# Altium PCB PCB1.PcbDoc (part 3 of 3)
Units mm, origin at the board's own origin, x right, y up, seen from the top; angles counter-clockwise.
Board outline 131 x 74 mm, 6 copper layers (Top Layer, Rele, Signals, +5V, GND, Bottom Layer), stack 1.732 mm thick; 176 components, 158 nets, 639 pads, 196 vias.
Unrouted connection lines stored in the file: 8.
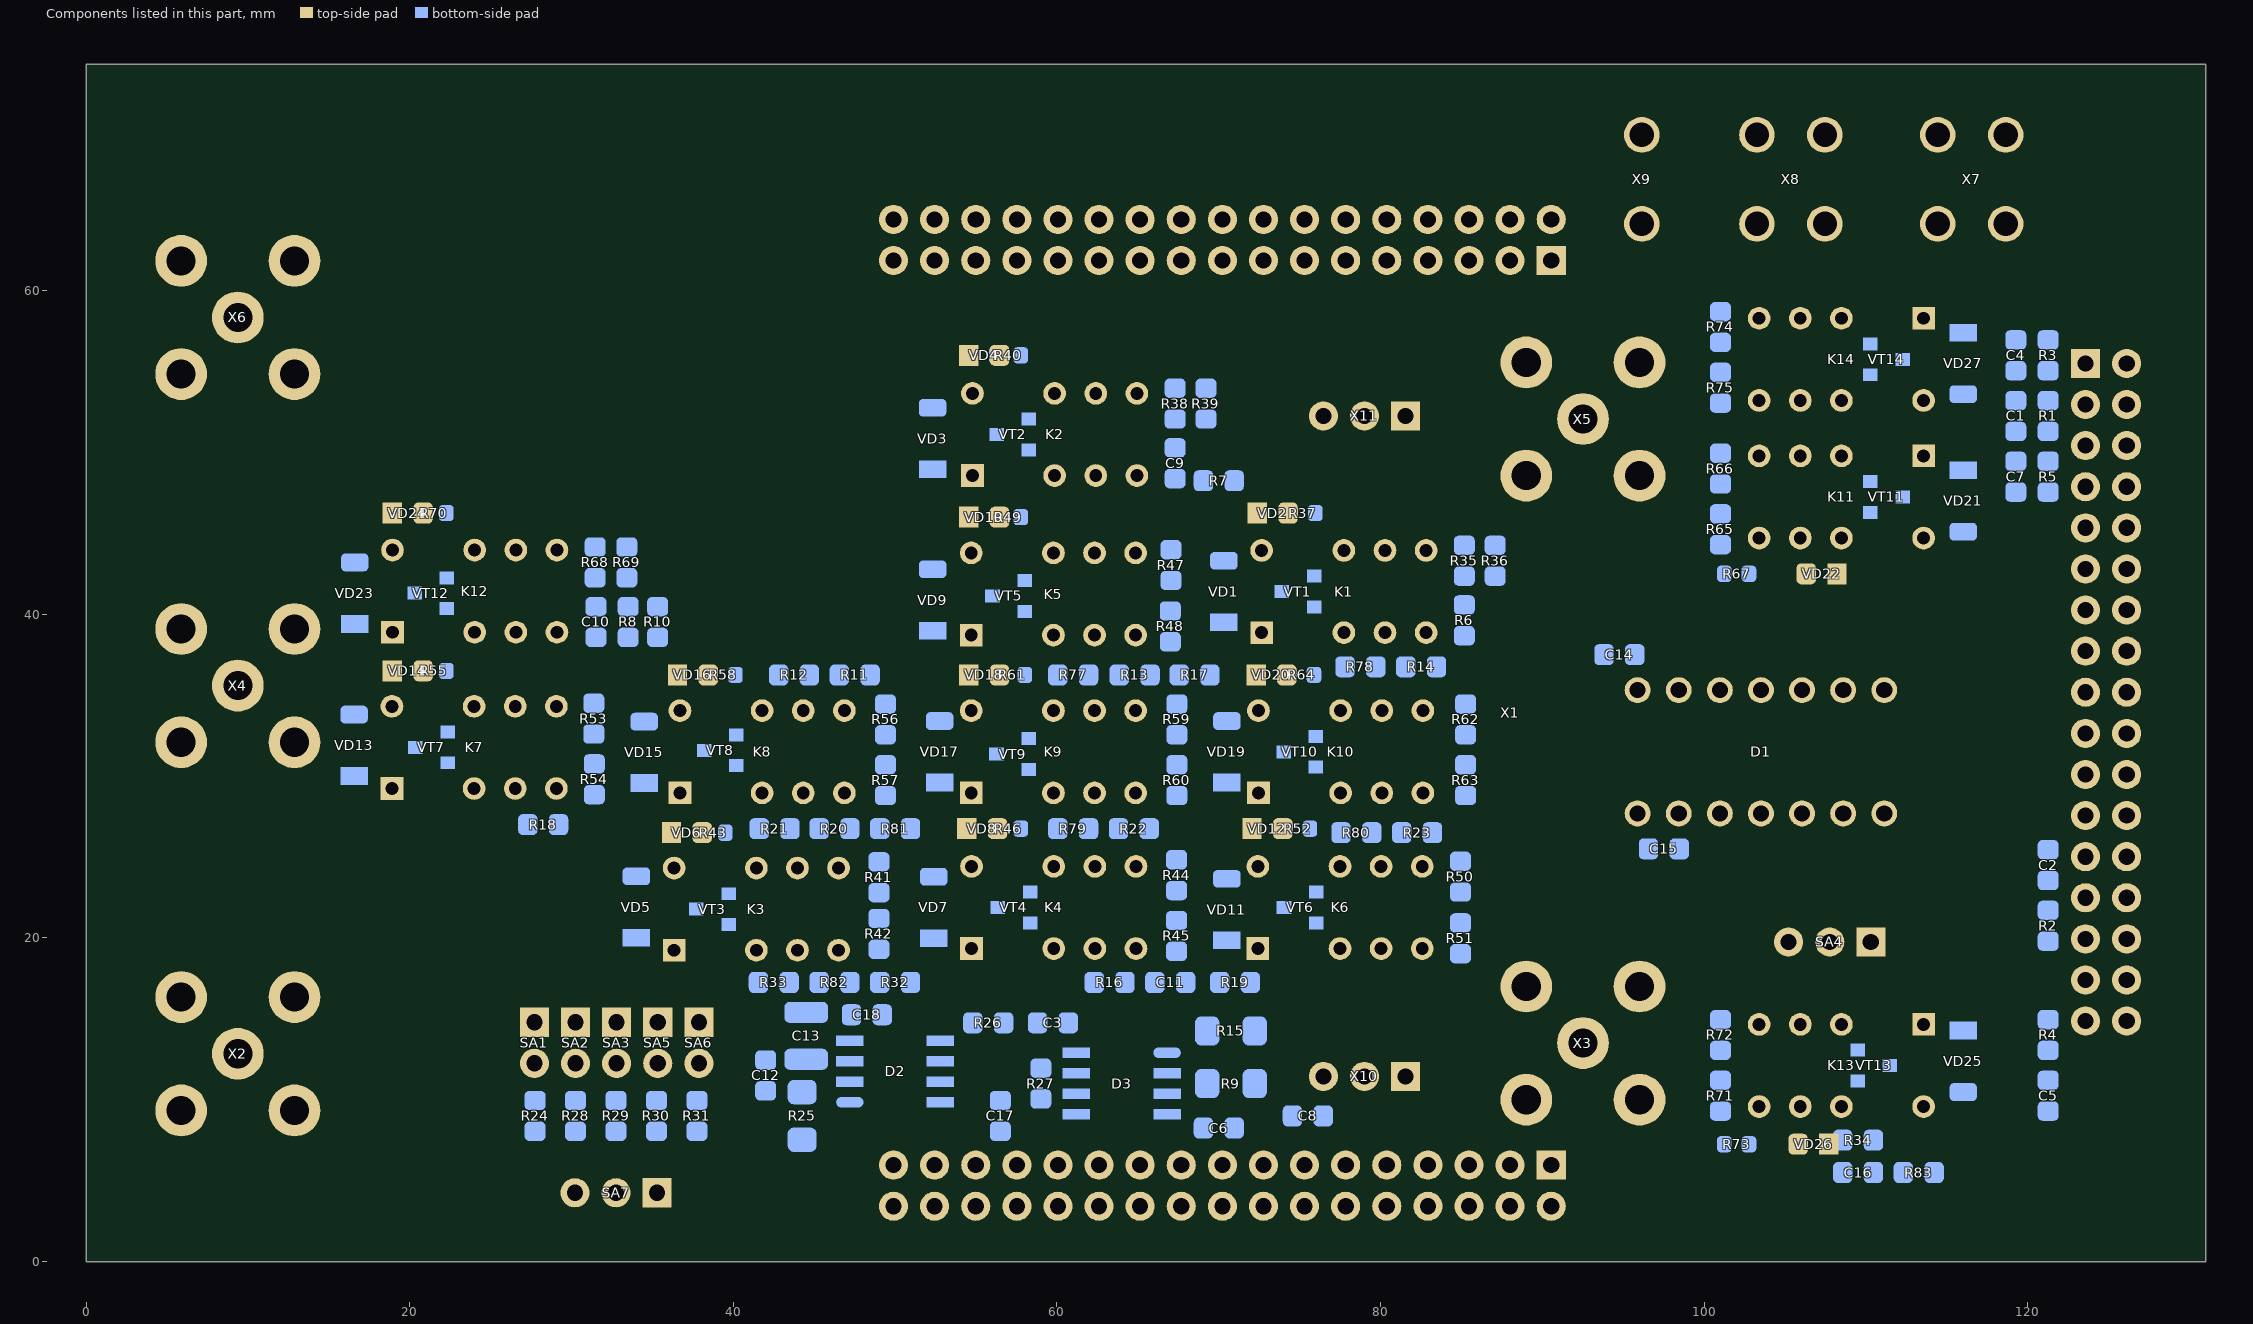
[diagram p7: the components of this part, seen from the top]

## Other copper (continued)
GND:
  pour cut-out: 122.058,25.095 122.058,24 122.5,24
  pour cut-out: 87,9 90.75,9 90.75,7
  pour cut-out: 91.277,9.65 91.277,5.959 90.539,5.959
  pour cut-out: 86.723,9.65 86.723,6 88,6
  pour cut-out: 20.74,35.592 19.75,35.592 19.75,36
  pour cut-out: 20.74,37.408 19.75,37.408 19.75,36.5
  pour cut-out: 17.639,40.187 17.639,34.312 18.903,34.312
  pour cut-out: 20.239,40.187 20.239,34.312 18.903,34.312
  pour cut-out: 122.413,22.323 122.413,20.471 123.001,20.471
  pour cut-out: 122.412,22.606 121.25,22.606 121.25,23.55
  pour cut-out: 121.25,24.458 123,24.458 123,24.25
  pour cut-out: 85.25,33.542 82.61,33.542 82.61,34.04
  pour cut-out: 85.25,35.358 82.61,35.358 82.61,34.04
  pour cut-out: 85.172,43.349 82.809,43.349 82.809,43.942
  pour cut-out: 85.172,45.165 82.809,45.165 82.809,43.942
  pour cut-out: 67.299,53.057 64.936,53.057 64.936,53.65
  pour cut-out: 67.299,54.873 64.936,54.873 64.936,53.65
  pour cut-out: 56.076,49.87 56.076,45.75 55.5,45.75
  pour cut-out: 53.476,49.87 53.476,43.79 54.7,43.79
  pour cut-out: 56.011,43.79 56.011,48.57 54.776,48.57
  pour cut-out: 56.49,35.342 55.5,35.342 55.5,35.75
  pour cut-out: 58,35.342 60.05,35.342 60.05,36.25
  pour cut-out: 56.49,37.158 55.5,37.158 55.5,36.75
  pour cut-out: 58,37.158 60.05,37.158 60.05,36.25
  pour cut-out: 53.389,34.04 53.389,38.71 54.7,38.71
  pour cut-out: 56,40.01 56,34.04 54.7,34.04
  pour cut-out: 49.408,33.542 46.86,33.542 46.86,34.04
  pour cut-out: 49.408,35.358 46.86,35.358 46.86,34.04
  pour cut-out: 38.61,35.342 42.8,35.342 42.8,36.25
  pour cut-out: 38.61,37.158 40.13,37.158 40.13,36.25
  pour cut-out: 35.4,27.966 35.4,24.318 36.429,24.318
  pour cut-out: 37.654,24.318 37.654,26.5 37.25,26.5
  pour cut-out: 37.082,26.5 37.082,28.75 37.75,28.75
  pour cut-out: 38,30.26 38,26.5 37.5,26.5
  pour cut-out: 40.469,28.96 40.469,26.75 41.6,26.75
  pour cut-out: 40.112,24.318 40.112,26.75 41.6,26.75
  pour cut-out: 39.51,25.592 41.6,25.592 41.6,26.75
  pour cut-out: 39.51,27.408 41.6,27.408 41.6,26.75
  pour cut-out: 42.458,17.25 42.458,19.238 41.423,19.238
  pour cut-out: 40.642,17.25 40.642,19.238 41.423,19.238
  pour cut-out: 30.337,3.103 32.75,3.103 32.75,4.25
  pour cut-out: 30.337,5.397 32.75,5.397 32.75,4.25
  pour cut-out: 32.75,2.743 35.29,2.743 35.29,4.25
  pour cut-out: 32.75,5.757 35.29,5.757 35.29,4.25
  pour cut-out: 122.412,47.752 122.412,45.339 123.559,45.339
  pour cut-out: 127.246,47.752 127.246,45.339 126.099,45.339
  pour cut-out: 122.412,48.006 122.412,50.419 123.559,50.419
  pour cut-out: 127.246,48.006 127.246,50.419 126.099,50.419
  pour cut-out: 55.196,30.26 59.78,30.26 59.78,28.684
  pour cut-out: 81.413,10.289 79,10.289 79,11.443
  pour cut-out: 81.413,12.597 79,12.597 79,12
  pour cut-out: 72.858,17.25 72.858,19 72.25,19
  pour cut-out: 71.042,17.25 71.042,19.25 72.5,19.25
  pour cut-out: 75.82,27.658 77.25,27.658 77.25,26.75
  pour cut-out: 73.203,26.75 73.203,28.505 73.75,28.505
  pour cut-out: 73.75,30.26 73.75,26.75 73.25,26.75
  pour cut-out: 66.191,24.42 66.191,26.81 65.76,26.81
  pour cut-out: 66.171,28.96 66.171,26.81 65.76,26.81
  pour cut-out: 67.408,33.542 64.86,33.542 64.86,34.04
  pour cut-out: 68.316,34.45 68.316,36.25 67.55,36.25
  pour cut-out: 67.55,37.158 65.8,37.158 65.8,36.25
  pour cut-out: 66.171,38.71 66.171,36.25 65.8,36.25
  pour cut-out: 58.469,38.71 58.469,36.25 60.05,36.25
  pour cut-out: 56.49,35.342 58,35.342 58,36.25
  pour cut-out: 56.49,37.158 58,37.158 58,36.25
  pour cut-out: 83.921,34.04 83.921,38.862 82.809,38.862
  pour cut-out: 85.172,37.766 82.809,37.766 82.809,38.862
  pour cut-out: 85.172,39.582 82.809,39.582 82.809,38.862
  pour cut-out: 76.418,38.862 76.418,34.04 77.53,34.04
  pour cut-out: 83.921,28.96 83.921,24.419 82.57,24.419
  pour cut-out: 32.75,5.007 35.5,5.007 35.5,3.5
  pour cut-out: 39.377,12.25 39.377,14.75 38,14.75
  pour cut-out: 26.203,12.25 26.203,14.79 27.71,14.79
  pour cut-out: 49,23.792 46.503,23.792 46.503,24.318
  pour cut-out: 48.108,26.75 48.108,24.318 46.503,24.318
  pour cut-out: 49,25.608 46.503,25.608 46.503,24.318
  pour cut-out: 46.292,26.75 46.292,24.318 46.503,24.318
  pour cut-out: 42.5,26.75 42.5,24.318 41.423,24.318
  pour cut-out: 40.692,26.75 40.692,24.318 41.423,24.318
  pour cut-out: 39.51,25.592 37.99,25.592 37.99,26.5
  pour cut-out: 37.99,27.408 39.51,27.408 39.51,26.5
  pour cut-out: 40.692,26.75 40.692,28.96 41.78,28.96
  pour cut-out: 42.508,26.75 42.508,28.96 41.78,28.96
  pour cut-out: 46.292,26.75 46.292,28.96 46.86,28.96
  pour cut-out: 48.108,26.75 48.108,28.96 46.86,28.96
  pour cut-out: 69.958,8.25 69.958,7 69.25,7
  pour cut-out: 68.142,8.25 68.142,7 68.75,7
  pour cut-out: 101,57.792 103.39,57.792 103.39,58.29
  pour cut-out: 101,59.608 103.39,59.608 103.39,58.29
  pour cut-out: 127.606,55.499 127.606,50.419 126.099,50.419
  pour cut-out: 126.099,57.006 123.559,57.006 123.559,55.499
  pour cut-out: 122.052,50.419 122.052,55.499 123.559,55.499
  pour cut-out: 124,49.5 125.5,49.5 125.5,46 124.25,46
  pour cut-out: 127.606,45.339 127.606,25.019 126.099,25.019
  pour cut-out: 122.052,25.019 122.052,45.339 123.559,45.339
  pour cut-out: 127.246,22.606 127.246,25.019 126.099,25.019
  pour cut-out: 124.5,23 125.25,23 125.25,24.25
  pour cut-out: 124.952,22.352 124.952,19.939 126.099,19.939
  pour cut-out: 127.223,22.178 127.223,19.939 126.099,19.939
  pour cut-out: 127.606,14.859 127.606,19.939 126.099,19.939
  pour cut-out: 123.559,13.352 126.099,13.352 126.099,14.859
  pour cut-out: 122.052,14.859 122.052,19.939 123.559,19.939
  pour cut-out: 110.45,4.592 108.55,4.592 108.55,5.5
  pour cut-out: 108.55,6.408 110.45,6.408 110.45,5.5
  pour cut-out: 106.708,7.25 106.708,9.75 105.75,9.75
  pour cut-out: 104.892,7.25 104.892,9.58 105.93,9.58
  pour cut-out: 108.47,8.269 103.39,8.269 103.39,9.58
  pour cut-out: 103.39,10.891 108.47,10.891 108.47,9.58
  pour cut-out: 108.47,13.349 103.39,13.349 103.39,14.66
  pour cut-out: 103.39,15.971 108.47,15.971 108.47,14.66
  pour cut-out: 105.337,18.603 107.75,18.603 107.75,19.75
  pour cut-out: 105.337,20.897 107.75,20.897 107.75,19.75
  pour cut-out: 107.75,18.243 110.29,18.243 110.29,19.75
  pour cut-out: 107.75,21.257 110.29,21.257 110.29,19.75
  pour cut-out: 111.12,26.278 106.04,26.278 106.04,27.69
  pour cut-out: 106.04,29.102 111.12,29.102 111.12,27.69
  pour cut-out: 103.627,26.644 106,26.644 106,27.75
  pour cut-out: 103.627,28.736 106.04,28.736 106.04,27.69
  pour cut-out: 103.373,26.644 100.96,26.644 100.96,27.69
  pour cut-out: 103.373,28.736 100.96,28.736 100.96,27.69
  pour cut-out: 100.96,26.278 96,26.278 96,27.75
  pour cut-out: 95.88,29.102 100.96,29.102 100.96,27.69
  pour cut-out: 111.12,33.898 106.04,33.898 106.04,35.31
  pour cut-out: 106.04,36.722 111.12,36.722 111.12,35.31
  pour cut-out: 103.373,36.356 101,36.356 101,35.25
  pour cut-out: 103.627,34.264 106.04,34.264 106.04,35.31
  pour cut-out: 103.627,36.356 106.04,36.356 106.04,35.31
  pour cut-out: 103.373,34.264 100.96,34.264 100.96,35.31
  pour cut-out: 100.96,33.898 96,33.898 96,35.5
  pour cut-out: 95.88,36.722 100.96,36.722 100.96,35.31
  pour cut-out: 107.208,42.5 107.208,44.71 105.93,44.71
  pour cut-out: 105.392,42.5 105.392,44.5 106.25,44.5
  pour cut-out: 108.47,43.399 103.39,43.399 103.39,44.71
  pour cut-out: 103.39,46.021 108.47,46.021 108.47,44.71
  pour cut-out: 108.47,48.479 103.25,48.479 103.25,49.75
  pour cut-out: 103.39,51.101 108.47,51.101 108.47,49.79
  pour cut-out: 108.47,51.899 103.39,51.899 103.39,53.21
  pour cut-out: 103.39,54.521 108.47,54.521 108.47,53.21
  pour cut-out: 108.47,56.979 103.39,56.979 103.39,58.29
  pour cut-out: 103.39,59.601 108.25,59.601 108.25,58.5
  pour cut-out: 50.026,65.546 52.439,65.546 52.439,64.399
  pour cut-out: 50.026,60.712 52.5,60.712 52.5,62
  pour cut-out: 50.104,62.821 50.104,64.399 52.439,64.399
  pour cut-out: 87.999,60.352 52.439,60.352 52.439,61.859
  pour cut-out: 87.999,60.352 90.539,60.352 90.539,61.859
  pour cut-out: 92.046,64.399 92.046,61.859 90.539,61.859
  pour cut-out: 52.439,65.906 90.539,65.906 90.539,64.399
  pour cut-out: 79,50.743 81.54,50.743 81.54,52.25
  pour cut-out: 79,50.743 76.46,50.743 76.46,52.25
  pour cut-out: 76.46,53.757 81.54,53.757 81.54,52.25
  pour cut-out: 64.936,54.961 59.856,54.961 59.856,53.65
  pour cut-out: 59.856,52.339 65,52.339 65,53.5
  pour cut-out: 64.936,49.881 59.856,49.881 59.856,48.57
  pour cut-out: 59.856,47.259 64.936,47.259 64.936,48.57
  pour cut-out: 67.049,43.078 64.86,43.078 64.86,43.79
  pour cut-out: 67.049,44.894 64.86,44.894 64.86,43.79
  pour cut-out: 64.86,45.101 59.78,45.101 59.78,43.79
  pour cut-out: 59.78,42.479 64.86,42.479 64.86,43.79
  pour cut-out: 64.86,40.021 59.78,40.021 59.78,38.71
  pour cut-out: 59.78,37.399 64.86,37.399 64.86,38.71
  pour cut-out: 58.469,34.04 58.469,36.25 60.55,36.25
  pour cut-out: 62.5,37.158 58.5,37.158 58.5,36.25
  pour cut-out: 63.408,36.25 63.408,34 62.25,34
  pour cut-out: 64.86,35.351 59.75,35.351 59.75,33.75
  pour cut-out: 59.78,32.729 64.86,32.729 64.86,34.04
  pour cut-out: 82.809,42.631 77.729,42.631 77.729,43.942
  pour cut-out: 77.729,45.253 82.809,45.253 82.809,43.942
  pour cut-out: 82.809,40.173 77.733,40.173 77.733,38.862
  pour cut-out: 77.729,37.551 82.809,37.551 82.809,38.862
  pour cut-out: 82.61,35.351 80.07,35.351 80.07,34.04
  pour cut-out: 77.53,32.729 82.61,32.729 82.61,34.04
  pour cut-out: 76.219,34.04 76.219,36.25 78.05,36.25
  pour cut-out: 74.2,35.342 79.95,35.342 79.95,36.25
  pour cut-out: 74.2,37.158 79.95,37.158 79.95,36.25
  pour cut-out: 73.92,25.842 77.8,25.842 77.8,26.75
  pour cut-out: 75.82,27.658 73.92,27.658 73.92,26.75
  pour cut-out: 76.219,28.96 76.219,26.75 77.8,26.75
  pour cut-out: 82.61,30.271 77.53,30.271 77.53,28.96
  pour cut-out: 84.933,25.643 82.57,25.643 82.57,24.419
  pour cut-out: 84.933,23.827 82.57,23.827 82.57,24.42
  pour cut-out: 77.49,23.109 82.57,23.109 82.57,24.42
  pour cut-out: 76.179,24.42 76.179,26.75 77.8,26.75
  pour cut-out: 80.03,18.029 77.49,18.029 77.49,19.34
  pour cut-out: 77.49,20.651 80.03,20.651 80.03,19.34
  pour cut-out: 79,9.936 76.46,9.936 76.46,11.443
  pour cut-out: 76.46,12.95 79,12.95 79,11.443
  pour cut-out: 63.168,26.81 63.168,28.96 62.32,28.96
  pour cut-out: 64.86,27.649 62.29,27.649 62.29,28.93
  pour cut-out: 59.78,30.271 64.86,30.271 64.86,28.96
  pour cut-out: 58.469,28.96 58.469,26.81 60.3,26.81
  pour cut-out: 56.3,27.658 60.3,27.658 60.3,26.81
  pour cut-out: 55.38,26.75 55.38,29 55.771,29.392
  pour cut-out: 56.3,25.842 58.5,25.842 58.5,26.75
  pour cut-out: 63.168,26.81 63.168,24.42 62.34,24.42
  pour cut-out: 58.489,24.42 58.489,26.81 60.3,26.81
  pour cut-out: 64.88,23.109 59.8,23.109 59.8,24.42
  pour cut-out: 59.8,25.731 64.88,25.731 64.88,24.42
  pour cut-out: 64.88,18.029 59.8,18.029 59.8,19.34
  pour cut-out: 59.8,20.651 64.88,20.651 64.88,19.34
  pour cut-out: 48.392,3.419 48.392,5.959 49.899,5.959
  pour cut-out: 90.539,1.912 49.899,1.912 49.899,3.419
  pour cut-out: 92.039,7.459 92.039,3.419 90.539,3.419
  pour cut-out: 50.193,7.437 90.539,7.437 90.539,5.959
  pour cut-out: 28.453,12.25 28.453,14.79 29.96,14.79
  pour cut-out: 37.87,10.743 27.71,10.743 27.71,12.25
  pour cut-out: 36,13.243 38.54,13.243 38.54,14.75
  pour cut-out: 36.75,16.257 39.485,16.257 39.485,14.555
  pour cut-out: 46.503,17.97 41.423,17.97 41.423,19.238
  pour cut-out: 41.423,20.549 46.503,20.549 46.503,19.238
  pour cut-out: 46.503,23.007 41.423,23.007 41.423,24.318
  pour cut-out: 41.423,25.629 46.503,25.629 46.503,24.318
  pour cut-out: 41.642,26.75 41.642,28.96 44.32,28.96
  pour cut-out: 46.86,27.649 41.78,27.649 41.78,28.96
  pour cut-out: 41.78,30.271 46.86,30.271 46.86,28.96
  pour cut-out: 43.708,36.25 43.708,34.04 41.78,34.04
  pour cut-out: 40.5,37.158 42.8,37.158 42.8,36.25
  pour cut-out: 40.469,34.04 40.469,36.25 41.241,36.25
  pour cut-out: 46.86,32.729 41.78,32.729 41.78,34.04
  pour cut-out: 41.78,35.351 46.86,35.351 46.86,34.04
  pour cut-out: 29.063,27.921 26.523,27.921 26.523,29.232
  pour cut-out: 26.523,30.543 29.063,30.543 29.063,29.232
  pour cut-out: 31.376,33.592 29.063,33.592 29.063,34.312
  pour cut-out: 31.376,35.408 29.063,35.408 29.063,34.312
  pour cut-out: 29.063,33.001 23.983,33.001 23.983,34.312
  pour cut-out: 23.983,35.623 29.063,35.623 29.063,34.312
  pour cut-out: 29.099,37.576 24.019,37.576 24.019,38.887
  pour cut-out: 24.019,40.198 29.099,40.198 29.099,38.887
  pour cut-out: 29.099,42.656 24.019,42.656 24.019,43.967
  pour cut-out: 31.462,43.247 29.099,43.247 29.099,43.967
  pour cut-out: 31.462,45.075 29.099,45.075 29.099,43.967
  pour cut-out: 24.019,45.278 29.099,45.278 29.099,43.967
Bottom Layer:
  pour cut-out: 104.546,27.563 104.546,24.75 104,24.75
  pour cut-out: 112.65,13.76 116.25,13.76 116.25,14.25
  pour cut-out: 110.82,11.52 113.498,11.52 113.498,12.12
  pour cut-out: 107.159,9.58 107.159,11.25 107.5,11.25
  pour cut-out: 64.69,12.348 65.5,12.348 65.5,11.5
  pour cut-out: 48.77,37.856 48.77,37.242 49.392,37.242
  pour cut-out: 48.79,3.419 48.79,5.959 49.899,5.959
  pour cut-out: 49.899,2.31 57.519,2.31 57.519,3.419
  pour cut-out: 60.059,2.31 57.519,2.31 57.519,3.419
  pour cut-out: 61.168,5.959 61.168,3.419 60.059,3.419
  pour cut-out: 60.059,7.068 57.519,7.068 57.519,5.959
  pour cut-out: 57.415,7.923 57.415,6.25 57,6.25
  pour cut-out: 54.979,7.466 57,7.466 57,6.25
  pour cut-out: 49.899,7.466 54.979,7.466 54.979,5.959
  pour cut-out: 103.373,34.264 100.96,34.264 100.96,35.31
  pour cut-out: 103.373,36.356 101,36.356 101,35.5
  pour cut-out: 98.42,34.301 100.96,34.301 100.96,35.31
  pour cut-out: 98.42,36.319 100.96,36.319 100.96,35.31
  pour cut-out: 103.373,26.933 103.373,25.5 102.592,25.5
  pour cut-out: 103.356,28.314 103.356,31.497 102.351,31.497
  pour cut-out: 95.685,26.304 92.25,26.304 92.25,26.75
  pour cut-out: 97.415,25.627 98.435,25.627 98.435,27.675
  pour cut-out: 95.685,25.627 95.685,27.25 96.25,27.25
  pour cut-out: 81.413,10.289 79.5,10.289 79.5,10.75
  pour cut-out: 81.413,12.597 79.75,12.597 79.75,12.25
  pour cut-out: 76.179,19.34 76.179,20.5 76.5,20.5
  pour cut-out: 77.49,20.651 76.5,20.651 76.5,20.5
  pour cut-out: 76.179,24.42 76.179,22.75 76.75,22.75
  pour cut-out: 76.179,24.42 76.179,26.5 77.55,26.5
  pour cut-out: 83.921,28.96 83.921,26.5 83,26.5
  pour cut-out: 80.07,30.271 82.61,30.271 82.61,28.96
  pour cut-out: 76.418,38.862 76.418,36.75 77.8,36.75
  pour cut-out: 77.729,40.173 80.5,40.173 80.5,39
  pour cut-out: 76.821,43.942 76.821,46.25 77.75,46.25
  pour cut-out: 80.269,45.253 85.172,45.253 85.172,44.257
  pour cut-out: 77.729,44.85 80.269,44.85 80.269,43.942
  pour cut-out: 76.821,43.942 76.821,42.25 77.5,42.25
  pour cut-out: 40.355,35.542 38.61,35.542 38.61,36.25
  pour cut-out: 38.385,36.958 40.13,36.958 40.13,36.25
  pour cut-out: 25.248,43.967 25.248,46.25 26,46.25
  pour cut-out: 32.322,44.455 32.322,42.255 31.462,42.255
  pour cut-out: 26.559,45.278 29.099,45.278 29.099,43.967
  pour cut-out: 25.248,43.967 25.248,42.25 26,42.25
  pour cut-out: 28.126,27.195 29.024,27.195 29.024,29.3
  pour cut-out: 29.063,30.14 26.523,30.14 26.523,29.232
  pour cut-out: 26.435,27.127 26.435,29 27,29
  pour cut-out: 48.171,28.96 48.171,26.75 47.2,26.75
  pour cut-out: 44.32,30.271 46.86,30.271 46.86,28.96
  pour cut-out: 61.092,17.6 61.092,19.34 62.34,19.34
  pour cut-out: 66.191,19.34 66.191,17.25 65.125,17.25
  pour cut-out: 62.34,20.651 64.88,20.651 64.88,19.34
  pour cut-out: 66.171,28.96 66.171,26.75 65.7,26.75
  pour cut-out: 62.32,30.271 64.86,30.271 64.86,28.96
  pour cut-out: 65.768,38.71 65.768,36.25 63.85,36.25
  pour cut-out: 64.86,39.618 62.32,39.618 62.32,38.71
  pour cut-out: 58.469,38.71 58.469,36.25 60.05,36.25
  pour cut-out: 58.469,38.71 58.469,39.75 58.75,39.75
  pour cut-out: 59.78,40.021 58.5,40.021 58.5,39.75
  pour cut-out: 59.78,40.021 62.32,40.021 62.32,38.71
  pour cut-out: 58.545,48.57 58.545,49.75 59,49.75
  pour cut-out: 59.856,49.881 58.75,49.881 58.75,49.75
  pour cut-out: 115.739,69.118 117.489,69.118 117.489,68.368
  pour cut-out: 116.853,69.275 116.853,67.25 118,67.25
  pour cut-out: 120.401,69.272 120.401,67.25 119.75,67.25
  pour cut-out: 116.201,69.275 116.201,67.25 115.5,67.25
  pour cut-out: 112.653,69.272 112.653,67.25 113,67.25
  pour cut-out: 109.225,69.275 109.225,67 108.75,67
  pour cut-out: 105.677,69.272 105.677,66.75 106.25,66.75
  pour cut-out: 88.65,14.723 86.5,14.723 86.5,16
  pour cut-out: 88.65,19.277 86.5,19.277 86.5,18.75
  pour cut-out: 112.65,57.39 116.75,57.39 116.75,58.25
  pour cut-out: 120.4,50.5 116,50.5 116,51.5
  pour cut-out: 57.366,42.681 59.75,42.681 59.75,42
  pour cut-out: 58.872,32.91 58.872,36.25 60.05,36.25
  pour cut-out: 57.687,22.23 57.687,26.75 60.05,26.75
  pour cut-out: 68.241,25.626 66.642,25.626 66.642,27.742
  pour cut-out: 85.06,18.16 86.75,18.16 86.75,18.75
  pour cut-out: 85.09,19.879 85.09,20.989 85.53,20.989
  pour cut-out: 37.243,20.138 34.007,20.138 34.007,20.005
  pour cut-out: 71.25,49.508 69.05,49.508 69.05,48.25
  pour cut-out: 70.064,51.765 70.064,48.25 69.05,48.25
  pour cut-out: 51.75,9.32 56.5,9.32 56.5,9.95
  pour cut-out: 58.65,9.24 56.474,9.24 56.474,9.924
  pour cut-out: 62.25,9.84 59,9.84 59,10.5
  pour cut-out: 75.64,9.35 75.64,11.443 76.46,11.443
  pour cut-out: 72.595,9.889 69.28,9.889 69.28,11
  pour cut-out: 73.181,11.525 73.181,14.25 72.22,14.25
  pour cut-out: 72.76,16.9 72.76,14.25 72.22,14.25
  pour cut-out: 72.76,16.9 72.76,19.34 72.41,19.34
  pour cut-out: 69.86,7.9 69.86,11 69.28,11
  pour cut-out: 84.312,43.957 84.312,45.75 84.75,45.75
  pour cut-out: 86.43,38.374 86.43,42.357 85.172,42.357
  pour cut-out: 87.427,41.547 85.172,41.547 85.172,42.357
  pour cut-out: 87.427,43.167 85.172,43.167 85.172,42.352
  pour cut-out: 84.312,43.957 84.312,40.574 85.172,40.574
  pour cut-out: 86.032,44.557 86.032,40.574 85.172,40.574
  pour cut-out: 84.408,26.15 84.408,24.5 82.75,24.5
  pour cut-out: 83.518,28.96 83.518,26.5 83.2,26.5
  pour cut-out: 114.252,6.752 114.252,6.321 114.695,6.321
  pour cut-out: 114.5,4.64 108.55,4.64 108.55,5.5
  pour cut-out: 107.35,10.711 107.35,5.5 108.55,5.5
  pour cut-out: 117.05,15.024 113.55,15.024 113.55,14.66
  pour cut-out: 97.64,25.85 97.64,27.675 98.435,27.675
  pour cut-out: 99.235,25.974 99.235,27.675 98.435,27.675
  pour cut-out: 95.007,27.186 95.007,28.25 94,28.25
  pour cut-out: 96.593,28.403 95.25,28.403 95.25,29.5
  pour cut-out: 102.985,43.208 101.24,43.208 101.24,42.5
  pour cut-out: 102.985,41.792 101.24,41.792 101.24,42.5
  pour cut-out: 100.15,48.85 100.15,41.65 101.85,41.65 101.85,48.85
  pour cut-out: 101.915,50.077 101.915,51.5 101.5,51.5
  pour cut-out: 100.085,50.077 100.085,51.5 100.5,51.5
  pour cut-out: 100.085,52.923 100.085,51.5 100.75,51.5
  pour cut-out: 69.554,51.255 67.298,51.255 67.298,52.064
  pour cut-out: 69.554,52.875 67.296,52.875 67.296,52.062
  pour cut-out: 69.35,49.11 67.299,49.11 67.299,48.382
  pour cut-out: 69.35,49.11 70.95,49.11 70.95,48.25
  pour cut-out: 69.35,47.39 70.95,47.39 70.95,48.25
  pour cut-out: 67.649,47.572 69.05,47.572 69.05,48.25
  pour cut-out: 68.159,49.982 68.159,48.382 67.299,48.382
  pour cut-out: 68.159,50.582 68.159,52.065 67.299,52.065
  pour cut-out: 68.159,54.265 68.159,52.062 67.296,52.062
  pour cut-out: 55.676,49.47 52.513,49.47 52.513,48.756
  pour cut-out: 55.6,39.61 52.317,39.61 52.317,38.977
  pour cut-out: 73.549,39.762 70.5,39.762 70.5,39.25
  pour cut-out: 68.268,34.75 68.268,36.25 67.55,36.25
  pour cut-out: 67.915,38.173 67.915,36.25 67.55,36.25
  pour cut-out: 66.085,38.173 66.085,37 66.5,37
  pour cut-out: 60.35,37.508 65.75,37.508 65.75,36.25
  pour cut-out: 66,25.492 66.75,25.492 66.75,25.75
  pour cut-out: 66.908,26.4 66.908,24.75 66.75,24.75
  pour cut-out: 62.25,25.89 65.76,25.89 65.76,26.81
  pour cut-out: 65.768,28.96 65.768,26.75 63.8,26.75
  pour cut-out: 64.86,29.868 62.32,29.868 62.32,28.96
  pour cut-out: 62.25,25.89 60.05,25.89 60.05,26.75
  pour cut-out: 58.872,28.96 58.872,26.75 60.05,26.75
  pour cut-out: 56.015,26.042 60.05,26.042 60.05,26.75
  pour cut-out: 56.015,27.458 60.05,27.458 60.05,26.75
  pour cut-out: 68.306,18.5 70.25,18.5 70.25,17.25
  pour cut-out: 69.45,20.6 69.45,17.25 70.05,17.25
  pour cut-out: 68.306,19.049 68.306,17.25 67.95,17.25
  pour cut-out: 66.476,19.049 66.476,17.25 67.95,17.25
  pour cut-out: 65.75,18.11 67.95,18.11 67.95,17.25
  pour cut-out: 65.75,18.11 62.35,18.11 62.35,17.2
  pour cut-out: 61.092,16.9 61.092,15 61.5,15
  pour cut-out: 59.89,14.4 59.89,12.905 61.2,12.905
  pour cut-out: 61.002,15.609 59.89,15.609 59.89,14.4
  pour cut-out: 53.99,15.1 53.99,14 54.5,14
  pour cut-out: 53.99,15.1 53.99,15.6 57.5,15.6
  pour cut-out: 42.35,11.64 44.5,11.64 44.5,12.5
  pour cut-out: 42.35,13.26 44,13.26 44,12.5
  pour cut-out: 48.11,15.385 48.11,13.75 47.649,13.75
  pour cut-out: 51.25,16.39 49.05,16.39 49.05,17.25
  pour cut-out: 50.065,15.377 50.065,17.25 49.05,17.25
  pour cut-out: 39.056,23.328 41.25,23.328 41.25,22.75
  pour cut-out: 28.39,27.35 28.39,29.232 29.063,29.232
  pour cut-out: 29.971,29.232 29.971,27 29.2,27
  pour cut-out: 19.803,30.132 17,30.132 17,29.5
  pour cut-out: 37.6,29.86 35.1,29.86 35.1,29.255
  pour cut-out: 30.526,35.3 30.526,36 30.75,36
  pour cut-out: 47.566,27.999 49,27.999 49,27.25
  pour cut-out: 48.493,28.673 48.493,27 49.25,27
  pour cut-out: 50.323,28.673 50.323,27 49.5,27
  pour cut-out: 48.548,31 48.548,32.75 49.5,32.75
  pour cut-out: 50.268,34.75 50.268,30.7 49.408,30.7
  pour cut-out: 49.658,35.9 49.658,34.5 49.25,34.5
  pour cut-out: 41.599,35.845 41.599,38.25 42.75,38.25
  pour cut-out: 33.85,37.364 35.3,37.364 35.3,38.55
  pour cut-out: 31.862,37.762 33.5,37.762 33.5,38.55
  pour cut-out: 30.633,42.709 30.633,38.572 31.512,38.572
  pour cut-out: 36.237,40.345 36.237,39 35.5,39
  pour cut-out: 35.195,41.337 33.478,41.337 33.478,40.472
  pour cut-out: 34.277,42.555 34.277,40.45 33.478,40.45
  pour cut-out: 33.067,43.065 31.457,43.065 31.457,42.25
  pour cut-out: 48.355,15.385 47.259,15.385 47.259,15.758
  pour cut-out: 48.1,14.587 48.1,13.75 47.649,13.75
  pour cut-out: 42.885,15.527 42.885,17.25 43.45,17.25
  pour cut-out: 61.282,13.43 65,13.43 65,14
  pour cut-out: 45.35,6.58 45.35,9.467 48.104,9.467
  pour cut-out: 48.26,9.845 48.26,11.115 47.2,11.115
  pour cut-out: 43.15,11.761 43.15,6.58 45.35,6.58
  pour cut-out: 76.821,38.862 76.821,36.75 77.8,36.75
  pour cut-out: 77.729,39.77 80.269,39.77 80.269,38.862
  pour cut-out: 73.35,29.86 70.25,29.86 70.25,29.5
  pour cut-out: 57.5,15.6 57.5,12.7 56.7,12.7
  pour cut-out: 61.282,13.43 56.7,13.43 56.7,12.46
  pour cut-out: 62.25,9.84 62.25,13.43 60.15,13.43
  pour cut-out: 59.85,12.75 55.5,12.75 55.5,11.75
  pour cut-out: 52.956,14.188 52.956,12.5 54,12.5
  pour cut-out: 54,15.6 57.5,15.6 57.5,13.9
  pour cut-out: 51.75,12.91 51.75,9.32 53.85,9.32
  pour cut-out: 55.62,20.24 52.884,20.24 52.884,19.75
  pour cut-out: 55.6,29.86 52.808,29.86 52.808,29.5
  pour cut-out: 45.73,13.075 45.73,17.25 47.291,17.25
  pour cut-out: 43.15,11.42 43.15,13.36 43.475,13.36
  pour cut-out: 48.25,14 48.25,11.065 47.15,11.065
  pour cut-out: 49.696,19.173 50.75,19.173 50.75,18.958
  pour cut-out: 48.292,19.173 47.5,19.173 47.5,18.943
  pour cut-out: 48.15,20.4 48.15,26.75 50.95,26.75 50.95,20.4 49.85,20.4
  pour cut-out: 43.963,20.146 41.423,20.146 41.423,19.238
  pour cut-out: 40.75,16.5 40.75,19.238 41.423,19.238
  pour cut-out: 40.75,16.4 43.963,16.4 43.963,19.238
  pour cut-out: 26.61,15.89 26.61,7.25 38.97,7.25 38.97,15.89
  pour cut-out: 40.872,34.04 40.872,35.75 41.75,35.75
  pour cut-out: 29.099,37.979 31.5,37.979 31.5,38.75
  pour cut-out: 29.099,39.795 31.512,39.795 31.512,38.572
  pour cut-out: 89,57.371 92.75,57.371 92.75,55.75
  pour cut-out: 109.378,49.79 109.378,51.5 108.5,51.5
  pour cut-out: 105.93,48.882 108.47,48.882 108.47,49.79
  pour cut-out: 106.678,20.037 106.678,21.75 107.5,21.75
  pour cut-out: 110.12,11.77 110.12,7.5 108.5,7.5
  pour cut-out: 107.35,8.75 107.35,11.17 109.47,11.17
  pour cut-out: 63.228,28.96 63.228,26.75 62.2,26.75
  pour cut-out: 96.5,37.081 96.5,35.31 95.681,35.31
  pour cut-out: 94.9,37.07 94.9,35.31 96.187,35.31
  pour cut-out: 117.05,48.15 117.05,51.25 116,51.25
  pour cut-out: 112.642,44.71 112.642,47.25 113.85,47.25
  pour cut-out: 103.39,57.382 101,57.382 101,58.7
  pour cut-out: 100.15,54.15 100.15,60.5 101.85,60.5 101.85,54.15
  pour cut-out: 101.702,52.923 103.25,52.923 103.25,52.149
  pour cut-out: 109.378,58.29 109.378,60.5 108.5,60.5
  pour cut-out: 105.93,57.382 108.47,57.382 108.47,58.29
  pour cut-out: 112.65,57.39 112.65,60.25 114.25,60.25
  pour cut-out: 116.633,56.65 119.25,56.65 119.25,57.364
  pour cut-out: 112.642,53.21 112.642,55.75 113.85,55.75
  pour cut-out: 118.4,56.15 118.4,57.75 122.1,57.75 122.1,56.15 120.1,56.15
  pour cut-out: 118.4,50.5 118.4,52.1 122.25,52.1 122.25,50.5 120.1,50.5
  pour cut-out: 118.4,48.35 118.4,46.75 122.1,46.75 122.1,48.35 120.1,48.35
  pour cut-out: 127.439,56.599 121.25,56.599 121.25,55.05
  pour cut-out: 120.4,57.75 120.4,46.75 122.1,46.75 122.1,57.75
  pour cut-out: 122.459,56.599 128,56.599 128,55.5
  pour cut-out: 123.559,49.31 128,49.31 128,50.75
  pour cut-out: 126.099,46.448 128,46.448 128,45.5
  pour cut-out: 126.099,26.45 128.25,26.45 128.25,27.5
  pour cut-out: 123.559,26.45 126.099,26.45 126.099,27.559
  pour cut-out: 122.45,45.339 122.45,27.559 123.559,27.559
  pour cut-out: 123.559,46.448 126.099,46.448 126.099,45.339
  pour cut-out: 118.627,62.814 125.5,62.814 125.5,63.25
  pour cut-out: 107.451,62.814 118.627,62.814 118.627,64.125
  pour cut-out: 103.251,62.814 107.451,62.814 107.451,64.125
  pour cut-out: 126.099,13.75 130.5,13.75 130.5,17.5
  pour cut-out: 128.9,17.66 130.5,17.66 130.5,18.5
  pour cut-out: 129.418,60.337 130.25,60.337 130.25,59.5
  pour cut-out: 122.45,17.399 122.45,14.859 123.559,14.859
  pour cut-out: 122.45,17.399 122.45,19.945 123.553,19.945
  pour cut-out: 127.101,22.306 128.103,22.306 128.103,21.995
  pour cut-out: 126.25,21.538 126.25,20.904 126.745,20.904
  pour cut-out: 123.559,21.048 121.25,21.048 121.25,19.8
  pour cut-out: 123.559,21.048 126.099,21.048 126.099,19.939
  pour cut-out: 120.4,19 120.4,24.35 122.1,24.35 122.1,20.505
  pour cut-out: 120.4,19 123.559,19 123.559,19.939
  pour cut-out: 126.099,18.83 123.559,18.83 123.559,19.939
  pour cut-out: 123.559,15.968 126.099,15.968 126.099,14.859
  pour cut-out: 120.4,15.75 126.099,15.75 126.099,14.859
  pour cut-out: 126.099,18.508 128.9,18.508 128.9,17.66
  pour cut-out: 124.99,17.399 124.99,14.859 126.099,14.859
  pour cut-out: 126.099,13.75 121.25,13.75 121.25,14.95
  pour cut-out: 120.4,10.4 120.4,15.75 122.1,15.75 122.1,10.4
  pour cut-out: 112.642,9.58 112.642,12.12 114.354,12.12
  pour cut-out: 108.47,13.752 109,13.752 109,14.25
  pour cut-out: 109.378,14.66 109.378,13.5 109,13.5
  pour cut-out: 100.15,6.4 100.15,8.1 103.75,8.1 103.75,6.4
  pour cut-out: 100.15,13.85 100.15,6.4 101.85,6.4 101.85,13.85
  pour cut-out: 80.109,11.443 80.109,9 79,9
  pour cut-out: 76.46,12.552 79,12.552 79,11.443
  pour cut-out: 73.318,24.42 73.318,22 72.25,22
  pour cut-out: 84.083,20.125 86.5,20.125 86.5,21.25
  pour cut-out: 85.25,22.25 87.25,22.25 87.25,22
  pour cut-out: 85.783,25.535 85.783,20.125 84.083,20.125 84.083,25.5
  pour cut-out: 76.582,24.42 76.582,22.75 77.25,22.75
  pour cut-out: 76.582,24.42 76.582,26.75 77.8,26.75
  pour cut-out: 73.12,27.6 73.12,25.9 76.6,25.9 76.6,27.6
  pour cut-out: 76.622,28.96 76.622,26.75 77.8,26.75
  pour cut-out: 77.53,29.868 82.61,29.868 82.61,28.96
  pour cut-out: 84.4,29.9 86.1,29.9 86.1,38 84.4,38
  pour cut-out: 76.622,34.04 76.622,32.5 77.25,32.5
  pour cut-out: 76.622,34.04 76.622,36.25 78.05,36.25
  pour cut-out: 73.37,37.1 73.37,35.4 76.85,35.4 76.85,37.1
  pour cut-out: 79.361,38.862 79.361,36.25 80,36.25
  pour cut-out: 73.557,43.942 73.557,41.5 72.5,41.5
  pour cut-out: 82.64,52.811 82.64,55.5 81.75,55.5
  pour cut-out: 79,51.141 81.54,51.141 81.54,52.25
  pour cut-out: 73.45,47.1 73.45,45.4 76.95,45.4 76.95,47.1
  pour cut-out: 64.936,47.662 67.299,47.662 67.299,50.282
  pour cut-out: 62.396,47.662 64.936,47.662 64.936,48.57
  pour cut-out: 66.449,47.582 66.449,52.062 67.296,52.062
  pour cut-out: 58.948,53.65 58.948,52 59.25,52
  pour cut-out: 58.948,53.65 58.948,56 59.75,56
  pour cut-out: 55.62,56.85 59.12,56.85 59.12,55.15 55.62,55.15
  pour cut-out: 55.684,53.65 55.684,51 54.25,51
  pour cut-out: 55.608,43.79 55.608,41.25 54.5,41.25
  pour cut-out: 55.62,46.85 55.62,45.15 59.12,45.15 59.12,46.85
  pour cut-out: 58.872,43.79 58.872,46 59.75,46
  pour cut-out: 58.872,43.79 58.872,42 59.75,42
  pour cut-out: 66.15,39.4 66.15,44.786 67.85,44.786 67.85,39.4
  pour cut-out: 73.358,34.04 73.358,31.5 72.5,31.5
  pour cut-out: 66.558,29.9 68.258,29.9 68.258,35.219 66.558,35.219
  pour cut-out: 63.65,35.663 63.65,32.5 62.195,32.5
  pour cut-out: 58.872,34.04 58.872,32.5 59.75,32.5
  pour cut-out: 55.5,37.1 59,37.1 59,35.4 55.5,35.4
  pour cut-out: 55.608,34.04 55.608,31.5 54.5,31.5
  pour cut-out: 59.78,29.868 62.32,29.868 62.32,28.96
  pour cut-out: 55.628,24.42 55.628,22 54.75,22
  pour cut-out: 66.541,20.276 66.541,25.626 68.241,25.626 68.241,20.276
  pour cut-out: 46.503,20.146 43.963,20.146 43.963,19.238
  pour cut-out: 40.872,34.04 40.872,32.5 42,32.5
  pour cut-out: 40.515,24.318 40.515,22.75 41.25,22.75
  pour cut-out: 40.515,24.318 40.515,26.75 42.55,26.75
  pour cut-out: 41.423,23.41 46.503,23.41 46.503,24.318
  pour cut-out: 44.32,29.868 46.86,29.868 46.86,28.96
  pour cut-out: 40.872,28.96 40.872,26.812 42.612,26.812
  pour cut-out: 40.2,27.35 42.55,27.35 42.55,26.567
  pour cut-out: 41.78,29.868 44.32,29.868 44.32,28.96
  pour cut-out: 37.25,27.35 37.25,25.65 40.75,25.65 40.75,27.35
  pour cut-out: 37.251,24.318 37.251,21.75 36.25,21.75
  pour cut-out: 37.608,34.04 37.608,31.5 36.75,31.5
  pour cut-out: 19.811,34.312 19.811,31.75 19,31.75
  pour cut-out: 30.526,35.3 32.258,35.3 32.258,29.95 30.558,29.95
  pour cut-out: 20,37.35 23.5,37.35 23.5,35.65 20,35.65
  pour cut-out: 34.267,41.455 34.267,38.572 31.512,38.572
  pour cut-out: 20,47.1 23.5,47.1 23.5,45.4 20,45.4
  pour cut-out: 19.847,43.967 19.847,41.25 18.75,41.25

## Silkscreen, mask and mechanical layers (free items; w line width, h text height)
Top Overlay:
  drawing of 55 lines, arcs and shapes, not listed
  text "OpAmp Type 3" at 24.842,66.702 h5
  text "ТО2192" at 1.488,65.71 h8
  text "EXTERNAL POWER" at 122.301,64.68 h0.6
  text "UO" at 93.389,59.305 h3
  text "- AUX +" at 99.95,59.296 h3
  text "- DUT +" at 111.2,59.296 h3
  text "DUT V-" at 118.125,55.05 h0.6
  text "RELE1" at 57.42,54.615 h2
  text "MEAS" at 75.701,53.51 h0.6
  text "DUT V+" at 118.125,52.55 h0.6
  text "AMP" at 71.241,51.114 h2
  text "DUT VO" at 118.125,50.05 h0.6
  text "OSC_OUT" at 4.199,49.163 h3
  text "SHORT CIRCUIT" at 78.201,48.51 h0.6
  text "ООО«ГК«СНАБЖЕНИЕ» / Разработано в 2026 году" at 27.51,46.996 h2
  text "RELE4" at 21.799,45.12 h2
  text "RELE3" at 75.11,45.12 h2
  text "RELE6" at 57.297,44.865 h2
  text "AMP" at 89.171,43.296 h3
  text "RELE2" at 109.049,41.37 h2
  text "5" at 98.7,40.9 h0.6 r90
  text "6" at 95.2,39.65 h0.6 r90
  text "4" at 102.2,39.65 h0.6 r90
  text "RELE5" at 21.798,35.37 h2
  text "RELE8" at 39.178,35.12 h2
  text "RELE10" at 57.297,35.115 h2
  text "RELE7" at 75.05,35.115 h2
  text "OSC_IN" at 5.417,26.413 h3
  text "RELE11" at 74.736,25.615 h2
  text "RELE9" at 38.86,25.37 h2
  text "RELE12" at 57.297,25.365 h2
  text "PINOUT" at 21.102,24.625 h2
  text "1" at 20.15,23.425 h0.6
  text "OUT" at 21.55,23.425 h0.6
  text "V+" at 25.55,23.425 h0.6
  text "6" at 27.9,23.425 h0.6
  text "1" at 95.2,22.75 h0.6 r90
  text "3" at 102.45,22.65 h0.6 r90
  text "2" at 20.15,21.925 h0.6
  text "V-" at 21.55,21.925 h0.6
  text "5" at 27.9,21.925 h0.6
  text "DOP" at 25.3,21.825 h0.6
  text "2" at 98.7,21.4 h0.6 r90
  text "GND" at 103.851,21.05 h0.6
  text "3" at 20.15,20.425 h0.6
  text "IN+" at 21.6,20.425 h0.6
  text "-IN" at 25.3,20.425 h0.6
  text "4" at 27.9,20.425 h0.6
  text "AUX V+" at 118.25,19.55 h0.6
  text "VEE" at 111.461,18.62 h2
  text "EP" at 21.25,18.31 h1
  text "-15V" at 107.55,17.05 h0.6
  text "+5V" at 118.401,16.8 h0.6
  text "VOLT" at 78.107,15.301 h3
  text "AUX V-" at 118.25,14.55 h0.6
  text "VDD" at 75.285,12.891 h0.6
  text "UO" at 70.837,10.37 h2
  text "100K" at 28.784,8.5 h1.5
  text "10K" at 31.708,8.5 h1.5
  text "Opt" at 26.35,8.49 h1.5
  text "2K" at 34.23,8.49 h1.5
  text "1K" at 36.73,8.49 h1.5
  text "RL" at 41.38,8.49 h2 r90
  text "GND" at 77.785,8.141 h0.6
  text "LOAD" at 60.134,7.398 h0.6 r45
  text "TP2" at 57.797,7.31 h0.6 r45
  text "DOP" at 62.897,7.31 h0.6 r45
  text "IN+" at 50.182,7.296 h0.6 r45
  text "IN-" at 52.732,7.296 h0.6 r45
  text "TP1" at 55.317,7.281 h0.6 r45
  text "RELE13" at 108.547,6.115 h2
  text "GND" at 30.503,6.05 h0.6
  text "GEN" at 6.739,4.046 h3
  text "LOAD" at 36.42,2.796 h2
  text "FORMULA" at 31.851,1.55 h0.6
Bottom Overlay:
  text "ТО2192" at 23.012,65.71 h8
  text "Плата спроектирована инженером-разработчиком Сергеевым Д.А." at 3.319,59.827 h2 r90
Board:
  the board outline again, w0.2

## Dimensions
131,74 to 131,0 on Dimension
0,74 to 131,74 on Dimension

## Text inside footprints (layer, text, board x,y; h text height)
K1: Bottom Overlay "+" at 73.729,38.202 h0.6; Bottom Overlay "-" at 73.879,43.512 h0.6
K2: Bottom Overlay "+" at 55.856,47.91 h0.6; Bottom Overlay "-" at 56.006,53.22 h0.6
K3: Bottom Overlay "+" at 37.423,18.578 h0.6; Bottom Overlay "-" at 37.573,23.888 h0.6
K4: Bottom Overlay "+" at 55.8,18.68 h0.6; Bottom Overlay "-" at 55.95,23.99 h0.6
K5: Bottom Overlay "+" at 55.78,38.05 h0.6; Bottom Overlay "-" at 55.93,43.36 h0.6
K6: Bottom Overlay "+" at 73.49,18.68 h0.6; Bottom Overlay "-" at 73.64,23.99 h0.6
K7: Bottom Overlay "+" at 19.983,28.572 h0.6; Bottom Overlay "-" at 20.133,33.882 h0.6
K8: Bottom Overlay "+" at 37.78,28.3 h0.6; Bottom Overlay "-" at 37.93,33.61 h0.6
K9: Bottom Overlay "+" at 55.78,28.3 h0.6; Bottom Overlay "-" at 55.93,33.61 h0.6
K10: Bottom Overlay "+" at 73.53,28.3 h0.6; Bottom Overlay "-" at 73.68,33.61 h0.6
K11: Bottom Overlay "+" at 112.47,50.45 h0.6 r180; Bottom Overlay "-" at 112.32,45.14 h0.6 r180
K12: Bottom Overlay "+" at 20.019,38.227 h0.6; Bottom Overlay "-" at 20.169,43.537 h0.6
K13: Bottom Overlay "-" at 112.32,10.01 h0.6 r180; Bottom Overlay "+" at 112.47,15.32 h0.6 r180
K14: Bottom Overlay "-" at 112.32,53.64 h2 r180; Bottom Overlay "+" at 112.47,58.95 h2 r180